# Altium PCB DAP-PCB-REV-4.PcbDoc (part 3 of 4)
Units mil, origin at the board's own origin, x right, y up, seen from the top; angles counter-clockwise.
Board outline 2559.06 x 2559.06 mil, 6 copper layers (L1 (SIG/PWR), L2 (GND), L3 (SIG), L4 (PWR), L5 (GND), L6 (SIG/PWR)), stack 64.976 mil thick; 309 components, 179 nets, 965 pads, 300 vias.
Unrouted connection lines stored in the file: 157.
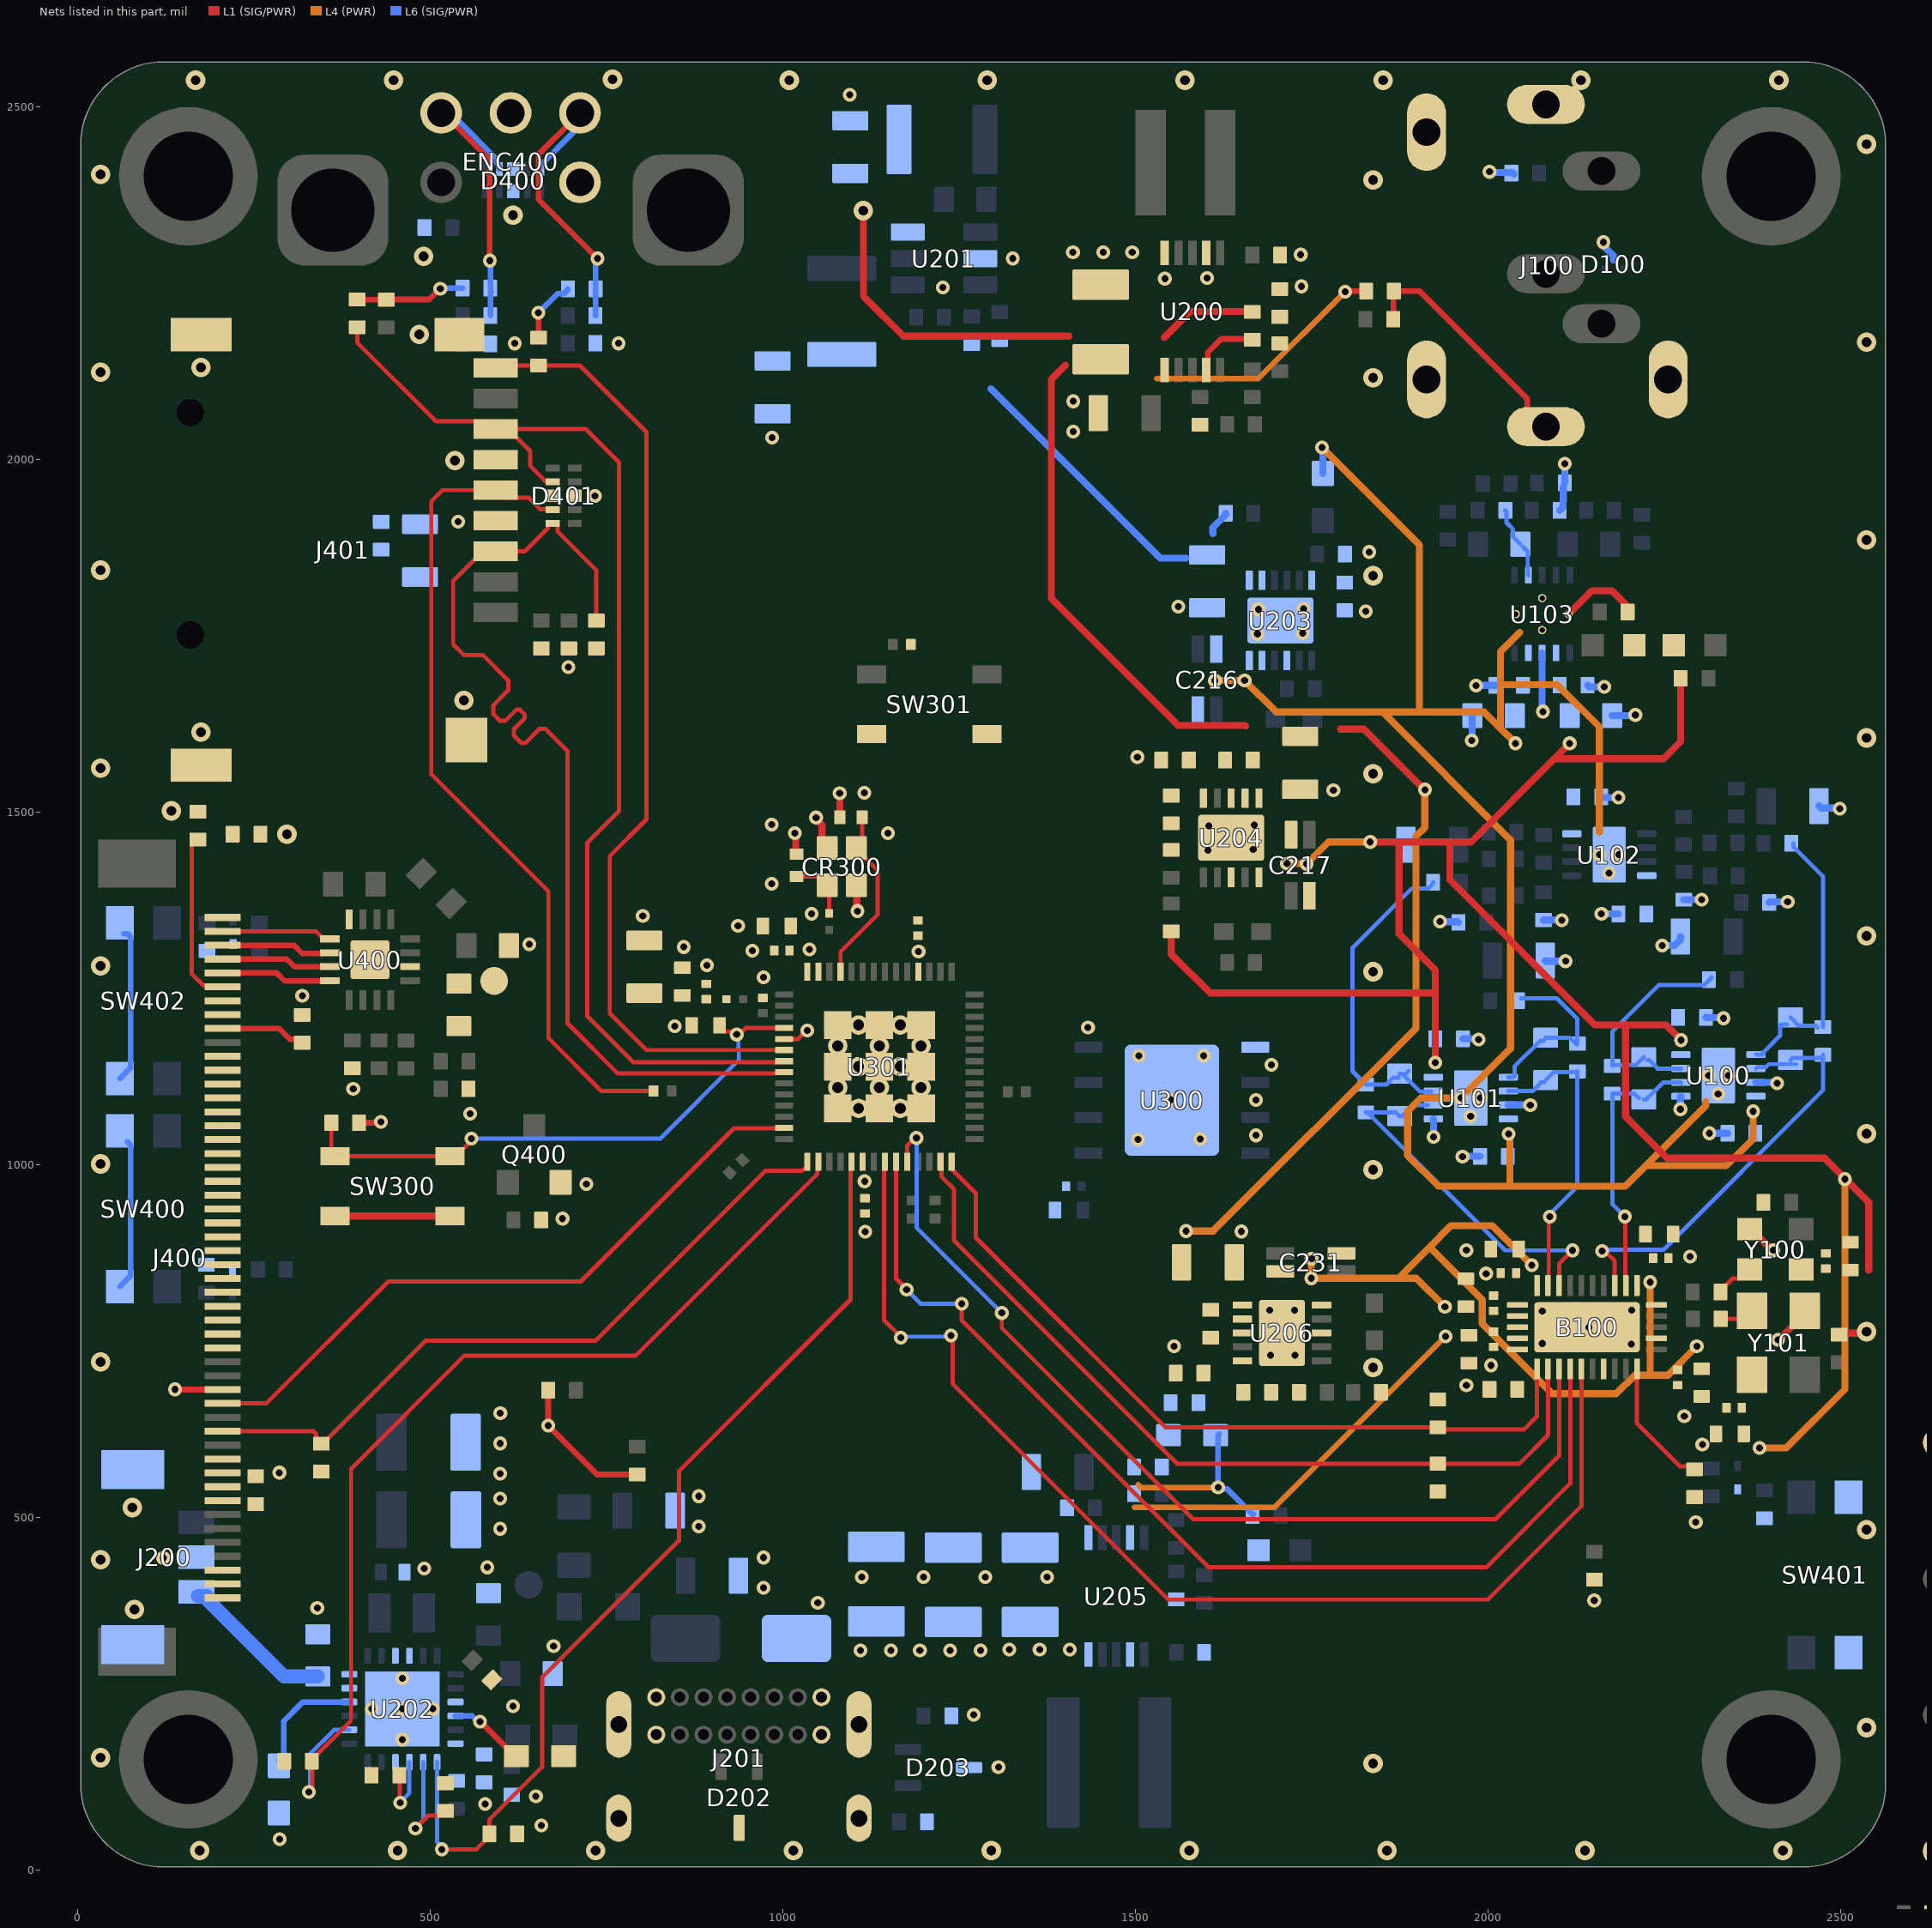
[diagram p5: the nets of this part, all layers, seen from the top]

## Via types
v1: diameter 19.68, hole 9.84, L1 (SIG/PWR) to L6 (SIG/PWR), tented both sides, 237 vias
v2: diameter 27.56, hole 13.78, L1 (SIG/PWR) to L6 (SIG/PWR), tented both sides, 56 vias
v3: diameter 49.21, hole 29.53, L1 (SIG/PWR) to L6 (SIG/PWR), 6 vias
v4: diameter 19.68, hole 9.84, L1 (SIG/PWR) to L6 (SIG/PWR), 1 vias

## Nets (pads, with @x,y where several pads share a name; then routed paths per layer and width w, separated by ;. In a path a pad name is that pad's centre, name@x,y a point inside that pad or via, vN(x,y) a via of type N, cw(c..) or ccw(c..) an arc to the next point about the centre after c; other vN are vias at no path point) (continued)
+3V3_DIG: B100.13 C122.2 C139.2 C225.2 C227.2 C228.2 C229.2 C300.2 C301.2 C303.2 C304.2 C305.2 C306.2 C307.2 C407.2 C408.2 C409.2 ENC400.4 J400.7 J400.8 J400.35 J400.40 J400.41 J400.42 J401.4 L300.2 R118.2 R208.2 R209.2 R210.2 R211.2 R223.2 R236.2 R241.2 R242.2 R253.2 R300.2 R301.2 R405.2 R407.2 R414.2 R415.2 R416.2 R417.2 R418.2 R419.2 SW400.2 SW400.4 SW401.2 SW401.4 SW402.2 SW402.4 TP203.1 U205.6 U301.20 U301.46 U301.55 U301.56 | length 2126.9
  L1 (SIG/PWR) w8: v1@139,681 139.71,681.71 J400.35@206,681.71 ; R415.2@396,2230.32 R415.2@399.32,2227 ; R300.2@399.69,1060 v1@429,1060 ; R415.2@402.32,2226.69 R418.2@438,2226.69 ; R418.2@438,2227 499,2227 514.08,2242.08 v1(514.82,2242.08) ; R419.2@654,2172.69 653.94,2172.74 653.94,2206.94 v1@654,2207 ; R211.2@669,681 667.7,679.7 667.7,630.55 v1(667.76,630.49) 736.93,561.32 794.69,561.32 R208.2@797,559 ; v1@1801,2239 R118.2@1827.32,2239
  L4 (PWR) w8: 1499,515 1697.66,515 1936.66,754 v1@1941,754 ; 1504,547 1508.05,542.95 v1(1617.43,542.95) ; 1530.28,2115 1674.55,2115 v1(1797.61,2238.07)
  L6 (SIG/PWR) w8: SW400.4@60.54,827.76 75.47,842.7 75.47,1028.61 71.09,1033 SW400.2@71,1033 ; SW402.4@60.54,1122.76 75.47,1137.7 75.47,1323.61 71.09,1328 SW402.2@66,1328 ; v1@516,2242 517,2243 R407.2@546.32,2243 ; v1(653.89,2208.14) 680.72,2234.97 689.79,2234.97 695.63,2240.82 R405.2@695.63,2242 ; R236.2@1619,619 1617.43,617.43 v1(1617.43,542.95) 1619.67,540.71 1630.57,540.71 1666.28,505 R253.2@1668,505
  other v1: 1112.45,416 1199.97,416 1287.48,416 1375,416 286.64,563.97 138.64,681.97 1939.86,757.2 1116.3,977 430.6,1061 1192.77,1302.77 1037.9,1305.75 696.2,1705.79 539.84,1912.16
+3V9: C204.2 C211.2 C220.2 C232.2 L201.1 R200.2 R225.2 R244.2 R250.2 TP209.1 U200.6 U201.6 U204.1 U204.2 U206.1 U206.2 | length 2213.5
  L1 (SIG/PWR) w10: v2(1114.55,2352.88) 1114.55,2231.45 1171,2175 1406,2175 ; 1401.04,2134.04 1381,2114 1381,1803 1561,1623 1656,1623 1656.56,1622.44 ; 1541,2173 1578,2210 R200.2@1670,2210 ; 1791,1618 1824,1618 1910,1532 v1@1911,1532
  L4 (PWR) w10: v1(1572.06,906.44) 1610.56,906.44 1898,1193.88 1898,1466 1910.58,1478.58 1910.58,1530.42 v1@1910,1531
  other v1: 1910.58,1532.11
+LED: C400.2 C413.2 J400.1 TP406.1 U400.6
-3V3: C108.2 C110.2 C125.2 C134.2 C135.2 C216.3 R220.2 R252.2 TP207.1 U100.4 U100.9 U101.4 U101.9 U102.4 U102.9 U103.4 U103.11 U203.11 U203.12 | length 3068.3
  L1 (SIG/PWR) w10: U103.11@2114.34,1781 2147.53,1814.19 2175.81,1814.19 R252.2@2197,1793
  L4 (PWR) w10: v1(1612.96,1686.62) 1613.16,1686.81 1655.81,1686.81 v1@1656,1687 ; v1(1655,1687) 1699.61,1642.39 1850.61,1642.39 ; v1(1764.88,2016.99) 1903,1878.88 1903,1642.39 ; U101.9@1961,1095 1905,1095 1886,1076 1886,1014 1930,970 2031,970 ; U101.9@1962,1095 2032,1165 2032,1461 1850.61,1642.39 ; v1@2030,1044 2031,1043 2031,970 ; v1@2040,1601 2039.94,1600.94 2035.78,1600.94 2017.74,1618.98 ; 2045,1755 2017.74,1727.74 2017.74,1681 ; 2158,1472 2158,1621 2098,1681 2017.74,1681 ; 2309,1090 2309,1084.28 2223.72,999 ; v1@2377,1076 2375.92,1074.92 2375.92,1036.92 2338,999 2223.72,999 ; 1850.61,1642.39 1903,1642.39 ; 1903,1642.39 1994.33,1642.39 2017.74,1618.98 ; 2017.74,1618.98 2017.74,1681 ; 2031,970 2194.72,970 2223.72,999
  L6 (SIG/PWR) w10: R220.2@1766,1980.46 v1@1766,2014
  other v1: 2029.19,1044 2375.92,1076.09 2038.94,1597.77
-3V9: C205.2 C206.2 C218.2 L202.2 R201.2 R219.2 R249.2 TP208.1 U203.1 U203.2 | length 412.6
  L6 (SIG/PWR) w10: 1295.44,2100.56 1535.65,1860.35 1572,1860.35 ; 1610,1895 1610,1903.72 1628.32,1922.03 R219.2@1628.32,1924
  other v1: 1411.96,2039.66
ADDR_DAC: B100.25 R135.1 | length 187.8
  L1 (SIG/PWR) w6: B100.25@2211.24,711 2211.24,633.76 2272.19,572.81 2291.19,572.81 R135.1@2295,569
BAT+: C215.2 J200.1 TP210.1 U202.11 U202.12 | length 220
  L6 (SIG/PWR) w20: J200.1@171,389 184,389 184.5,388.5 184.5,383.74 293.28,274.96 C215.2@341,274.96
BOOT0: R301.1 R302.1 TP300.1 U301.5 | length 33.8
  L1 (SIG/PWR) w6: U301.5@1002.41,1178.77 1021.77,1178.77 v1@1032,1189
  other v1: 1034.95,1190.89
BOOT_BQ: C207.2 U202.21
  other v1: 618,233
CD_SD: J401.CD R419.1 U301.6 | length 1368.8
  L1 (SIG/PWR) w6: J401.CD@593.12,2129.87 596.56,2133.32 R419.1@654,2133.32 712.69,2133.32 807,2039 807,1490 755,1438 755,1215 806.98,1163.02 U301.6@1002.41,1163.02
CE_BQ: R221.2 U202.1 U301.19 | length 1360.9
  L1 (SIG/PWR) w6: v1(517,30) 566,30 577.47,41.47 577.47,43.19 580.28,46 R221.2@582,46 ; R221.2@584.32,52 584.32,72.03 659,146.71 659,273.71 853,467.71 853,566 1096.46,809.46 1096.46,987.73 1096.55,987.82 1096.55,999.55 U301.19@1098,1001
  L6 (SIG/PWR) w6: U202.1@510.21,153.7 510.21,40.49 517,33.7 v1(517,30)
CHIP_PU: C309.2 R300.1 SW300.3 SW300.4 TP301.1 U301.4 | length 809.5
  L1 (SIG/PWR) w6: R300.1@360,1057 360.32,1056.69 360.32,1017.31 SW300.4@365.31,1012.32 SW300.3@528.69,1012.32 536.57,1012.32 v1@561,1036.76 ; C309.2@914,1193.54 914,1191.73 916.54,1189.19 927.11,1189.19 931.3,1185 938.7,1185 948.22,1194.52 U301.4@999.48,1194.52
  L6 (SIG/PWR) w6: v1(558.78,1037.39) 826.52,1037.39 938,1148.86 938,1162.58 937.42,1163.16 937.42,1182.58 v1(935,1185)
CLK_SD: D401.4 J401.5 R307.2 | length 1199.5
  L1 (SIG/PWR) w6: J401.5@593.12,1956.65 603.9,1945.87 640.13,1945.87 656,1930 ; J401.5@593.09,1956.68 517.68,1956.68 502,1941 502,1554 668,1388 668,1180 743,1105 815,1105 R307.2@817,1103 ; 656,1929.83 672.17,1929.83 D401.4@673,1929
CMD_SD: D401.5 J401.3 R414.1 U301.8 | length 1502.3
  L1 (SIG/PWR) w6: J401.3@593.12,1870.03 634.72,1870.03 667.16,1902.47 667.16,1907.39 669.08,1909.31 D401.5@674,1909.31 ; J401.3@593.42,1870.34 582.34,1859.25 564.25,1859.25 533,1828 533,1738 548,1723 575,1723 611,1687 611,1673 590,1652 590,1639 599,1630 607,1630 622.51,1645.51 627.49,1645.51 634.51,1638.49 634.51,1633.51 619,1618 619,1609 630.01,1597.99 634.99,1597.99 655,1618 664,1618 695,1587 695,1201 765.89,1130.11 989.1,1130.11 989.18,1130.19 1001.07,1130.19 U301.8@1002.41,1131.52 ; D401.5@678.92,1909.31 680.84,1907.39 680.84,1898.16 736,1843 R414.1@736,1773
CS_LCD: J400.38 R413.2 U301.15 | length 1002.6
  L1 (SIG/PWR) w6: J400.38@206,622.65 334.93,622.65 338.45,619.14 338.45,611.84 343.29,607 R413.2@344,607 ; R413.2@346,605 347.97,605 493.97,751 735,751 976,992 1028,992 1030.76,994.76 1033.56,994.76 1035,996.2 U301.15@1035,999
D/CX_LCD: J400.36 TP404.1 U301.13 | length 953.1
  L1 (SIG/PWR) w6: J400.36@206,662.02 268.02,662.02 441,835 714,835 931,1052 U301.13@997.6,1052
DACL: B100.8 C107.2 R103.1 U101.6 | length 528.7
  L1 (SIG/PWR) w6: B100.8@2101.01,829.11 2101.01,860.01 v1(2120,879)
  L6 (SIG/PWR) w5.98: C107.2@1874.76,1069.24 1869.31,1074.69 R103.1@1826.87,1074.69 1828.84,1074.69 2024.53,879 v1(2120,879) ; C107.2@1874.87,1069.34 1878.31,1069.34 1893.97,1085 U101.6@1915,1085
DACLB: B100.9 C101.2 R101.1 U101.2 | length 421.9
  L1 (SIG/PWR) w6: B100.9@2085.26,829.11 2086.2,830.05 2086.2,923.2 v1@2087,924
  L6 (SIG/PWR) w5.98: U101.2@2028.93,1104.84 2063.64,1104.84 2067.14,1108.35 2067.14,1109.06 2075.08,1117 C101.2@2079,1117 ; C101.2@2081.87,1120.34 2093.15,1131.62 2125.79,1131.62 R101.1@2126.87,1132.69 2126.87,969.87 v1@2086,929
  other v1: 2087.54,926.67
DACR: B100.3 C100.2 R100.1 U100.2 | length 623.2
  L1 (SIG/PWR) w6: v1(2162,878) 2165.7,878 2175.21,868.49 2175.51,868.49 2179.75,864.25 B100.3@2179.75,829.11
  L6 (SIG/PWR) w5.98: v1(2162,878) 2164,880 2249.02,880 2475,1105.98 R100.1@2475,1152 ; U100.2@2379.93,1136.84 2381.86,1138.77 2393.85,1138.77 2398.08,1143 C100.2@2437,1143 ; C100.2@2429,1149 2432,1152 R100.1@2475,1152 ; R100.1@2475,1156.32 R100.1@2475,1152
DACRB: B100.2 C106.2 R102.1 U100.6 | length 379.6
  L1 (SIG/PWR) w6: v1@2194,923 2194.75,922.25 2194.75,829.86 B100.2@2195.5,829.11
  L6 (SIG/PWR) w5.98: v1(2194,927) 2176.38,944.62 R102.1@2176.38,1101.13 2207.87,1101.13 C106.2@2214,1095 ; C106.2@2221,1092.96 2224.44,1092.96 2248.64,1117.16 2272.84,1117.16 U100.6@2274,1116
DAT0_SD: D401.2 J401.7 R415.1 U301.7 | length 1632.7
  L1 (SIG/PWR) w6: R415.1@397,2187.63 397,2166 508.96,2054.04 569.96,2054.04 J401.7@571,2053 ; 662.86,1970.29 667.71,1970.29 D401.2@670,1968 ; 663,1970 642.31,1990.69 642.31,2011.79 610.83,2043.26 720.74,2043.26 768,1996 768,1502 723,1457 723,1211 788.06,1145.94 1001.07,1145.94 U301.7@1002.41,1147.27
DATA1_DAC: B100.19 TP100.1 U301.23 | length 1517.9
  L1 (SIG/PWR) w6: U301.23@1160.87,1004.56 1160.87,839.13 v1@1177,823 ; v1(1253.85,803.35) 1253.85,780.15 1604,430 1998,430 2116.76,548.76 B100.19@2116.76,711
  L6 (SIG/PWR) w6: v1(1175.85,823.35) 1195.85,803.35 1252.35,803.35 v1@1254,805
DATA2_DAC: B100.18 TP101.1 U301.24 | length 1420.3
  L1 (SIG/PWR) w6: U301.24@1176.62,1004.56 1176.62,1027.62 v1@1188,1039 ; v1(1310.85,790.35) 1310.85,769.15 1582,498 2011,498 2101.01,588.01 B100.18@2101.01,711
  L6 (SIG/PWR) w6: v1@1191,1037 1189.85,1035.85 1189.85,911.35 v1(1310.85,790.35)
  other v1: 1189.85,1038.35
DATA_CLK_DAC: B100.20 TP102.1 U301.22 | length 1667.8
  L1 (SIG/PWR) w6: U301.22@1145.12,1004.56 1143.79,1003.22 1143.79,991.33 1143.7,991.25 1143.7,780.3 v1@1168,756 ; v1@1241,757.48 1241,690 1547,384 2000,384 2132.5,516.5 B100.20@2132.5,711
  L6 (SIG/PWR) w6: v1(1167.61,755.27) 1169.11,756.77 1238.77,756.77 v1@1240,758
  other v1: 1238.61,758.27
DVDD: B100.15 C117.2
EN1_BQ: R209.1 U202.2 | length 147.7
  L1 (SIG/PWR) w6: v1(479.44,59.56) 497.49,77.6 518.6,77.6 R209.1@523,82
  L6 (SIG/PWR) w5.98: v1@481.58,62.58 490.53,71.53 U202.2@490.53,153.7
EN2_BQ: R216.2 U202.3 | length 100.4
  L1 (SIG/PWR) w6: R216.2@457,133 457.34,132.66 457.34,96.66 v1(458,96)
  L6 (SIG/PWR) w6: v1(458,96) 458,96.96 470.84,109.8 U202.3@470.84,153.7
EN_DAC_LDO+: R244.1 R247.2 U206.3
EN_LDO+: R225.1 R231.2 U204.3
ENC_A_1: D400.5 ENC400.1 R400.1 R405.1 | length 427.9
  L1 (SIG/PWR) w7.99: ENC400.1@711,2484 705.43,2484 653.89,2432.47 653.89,2369 v1(737.82,2285.08)
  L6 (SIG/PWR) w7.99: D400.5@656.06,2411.5 656.06,2416.42 703.08,2463.44 703.08,2473.08 ENC400.1@708,2478 ; R400.1@734.69,2204 734.84,2204.16 R405.1@734.84,2239.84 ; R405.1@735,2242 735,2284 v1@736,2285
ENC_B_1: D400.2 ENC400.3 R407.1 R408.2 | length 422.7
  L1 (SIG/PWR) w7.99: ENC400.3@514,2486 524,2486 584.82,2425.18 v1(584.82,2282.08)
  L6 (SIG/PWR) w7.99: ENC400.3@523.65,2481.65 539.04,2481.65 594.55,2426.15 594.55,2420.44 597.39,2417.59 D400.2@597.39,2411.5 ; R408.2@585.69,2204 585.69,2236.69 R407.1@587,2238 ; R407.1@585.69,2243 v1@585.69,2282.32
FB_BB_3.3: C225.1 C226.1 R236.1 R240.2 U205.9
FB_BB_3.9: R200.1 R212.2 R213.2 U200.9 | length 91.8
  L1 (SIG/PWR) w7.99: U200.9@1600.68,2127.05 1602.69,2129.06 1602.69,2151.69 1622,2171 R200.1@1661,2171
GND: B100.11 B100.14 B100.22 B100.30 B100.31 C102.1 C103.1 C104.1 C105.1 C108.1 C109.1 C110.1 C111.1 C112.1 C113.1 C114.1 C115.1 C116.1 C117.1 C119.1 C120.1 C121.1 C122.1 C125.1 C126.1 C127.1 C128.1 C129.1 C130.1 C131.1 C132.2 C133.1 C134.1 C135.1 C136.1 C137.2 C139.1 C200.1 C202.1 C203.1 C204.1 C206.1 C208.1 C209.1 C210.1 C211.1 C213.1 C214.1 C215.1 C216.2 C217.2 C218.1 C219.1 C220.1 C221.1 C224.1 C227.1 C228.1 C229.1 C230.1 C231.2 C232.1 C234.1 C300.1 C301.1 C302.1 C303.1 C304.1 C305.1 C306.1 C307.1 C308.2 C309.1 C310.2 C311.1 C312.1 C400.1 C404.1 C405.1 C407.1 C408.1 C409.1 C412.1 C413.1 CR300.2 CR300.4 D100.1 D201.A D202.3 D203.3 D205.A D206.C D207.C D208.A D209.C D400.3 D400.8 D401.3 D401.8 D402.A D403.A D404.A ENC400.2 J100.1 J100.SH1 J100.SH2 J100.SH3 J200.2 J200.4 J200.5 J201.A1 J201.A12 J201.B1 J201.B12 J201.S1 J201.S2 J201.S3 J201.S4 J400.11 J400.12 J400.13 J400.14 J400.15 J400.16 J400.17 J400.18 J400.19 J400.20 J400.21 J400.22 J400.23 J400.24 J400.25 J400.26 J400.27 J400.28 J400.29 J400.30 J400.31 J400.32 J400.43 J400.48 J400.49 J400.50 J401.6 J401.G1 J401.G2 J401.G3 J401.G4 Q400.2 R106.1 R107.1 R108.1 R111.1 R112.1 R113.1 R126.1 R129.1 R133.1 R135.2 R205.1 R207.1 R212.1 R215.1 R216.1 R217.1 R218.1 R221.1 R224.1 R226.1 R228.1 R229.1 R230.1 R231.1 R234.1 R235.1 R239.1 R240.1 R245.1 R246.1 R247.1 R303.1 R401.1 R402.1 R403.1 R404.1 R406.1 R412.1 R413.1 R422.1 R424.1 R425.1 SW300.1 SW300.2 SW301.3 SW301.4 TP211.1 TP212.1 TP213.1 TP214.1 TP215.1 TP216.1 TP217.1 TP218.1 TP219.1 TP220.1 TP221.1 TP222.1 U100.3 U100.5 U101.3 U101.5 U103.3 U200.2 U200.5 U201.2 U202.4 U202.15 U202.16 U202.25 U203.9 U203.13 U204.8 U204.11 U205.2 U205.5 U206.8 U206.11 U300.4 U300.9 U301.57 U400.12 U400.17 Y100.2 Y101.2 | length 1195.4
  L1 (SIG/PWR) w10: SW300.2@365.31,927.68 519.32,927.68 SW300.1@522,925 ; v1@1018,1470 1018.73,1469.27 1018.73,1442.02 C308.2@1020,1440.75 ; v1@1047,1492 1047,1490.39 1056.08,1481.31 1056.08,1456.82 CR300.2@1063.33,1449.57 ; C310.2@1081.25,1493 1081.13,1493.13 1081.13,1526.13 v1@1083,1528 ; CR300.4@1103,1395 1105.38,1392.62 1105.38,1360.73 v1(1106.08,1360.02) ; Y100.2@2371.17,909.09 2373.13,909.09 v1@2402.22,880 ; v1@2412,751.94 2449.39,789.33 Y101.2@2449.39,793.27 ; R107.1@2498,759.68 2500.02,761.71 2529.71,761.71 v2@2534,766
  L6 (SIG/PWR) w10: U101.5@1922.63,1065.47 1922.74,1065.47 1922.81,1065.39 1922.81,1040.19 v1(1923,1040) ; v1@1933,1345 1957.32,1345 R126.1@1958.32,1344 ; C111.1@1964.68,1179 v1@1984,1179 ; v1@1965,1012 1965.38,1012.38 C110.1@1988.91,1012.38 ; v1(1977,1602) 1977.51,1602.51 1977.51,1636.49 C135.1@1978.01,1637 ; v1@1986,1680 C134.1@2010.32,1680 ; v1(2002.23,2408) 2003.23,2407 2035,2407 R129.1@2037,2405 ; U101.3@2028.93,1085.16 2029.01,1085.08 2059.92,1085.08 v1(2060,1085) ; U103.3@2076.94,1725.88 2076.94,1645.06 v1@2077,1645 ; C132.2@2078.95,1347.31 2104.69,1347.31 v1@2105,1347 ; C131.1@2081.4,1290 2082.4,1289 v1(2110,1289) ; R108.1@2101.68,1928 2106.53,1932.84 2106.53,1940.2 2107,1940.67 C133.1@2107,1961 ; C133.1@2109,1967 v1(2109,1994) ; C128.1@2141.22,1680.25 2143.47,1678 v1@2162,1678 ; C126.1@2160.68,1522 2161.68,1521 v1@2180,1521 ; v1@2162,1356 C125.1@2185.05,1356 ; v1@2163,2304 2165.27,2304 2165.58,2303.7 2165.58,2301.42 2178,2289 D100.1@2178,2282.91 ; C129.1@2176.05,1637.25 2209.25,1637.25 v1@2210,1638 ; v1(2247,1311) 2264.22,1311 2273,1319.78 C136.1@2273,1324 ; v1@2273,1082 2273,1097.39 2273.08,1097.47 U100.5@2273.63,1097.47 ; C137.2@2277.57,1376.31 2302.69,1376.31 v1@2303,1376 ; C109.1@2309.06,1209.13 2309.2,1209 v1@2334,1209 ; v1@2315,1045 2315.13,1045.13 C108.1@2339.69,1045.13 ; U100.3@2379.93,1117.16 2380.01,1117.08 2408.92,1117.08 v1(2410,1116) ; R133.1@2398.68,1372 2399.68,1373 v1@2418,1373 ; C130.1@2469.4,1509 2472.4,1506 v4@2493,1506
  other v1: 286.95,44.55 658,64 578.32,94.09 650.32,105.09 1306.03,146.65 461,185.69 1271.03,220.65 417.69,229 461,229 504.31,229 461,272.31 1110.62,311.96 1153.62,311.96 1194.62,311.96 1237.62,311.96 1280.62,311.96 1321.41,313.02 1364.41,313.02 1407.41,313.02 675.32,318.09 340.32,372.09 1049.95,379.55 2150.71,382.83 973.05,400.6 492,428 581.28,429.71 122,443 973.05,443.6 599.66,484.42 881.05,487.6 2294.71,493.83 599.66,527.42 881.05,530.6 599.66,562.42 2304,604 599.66,605.42 2278.43,644.11 599.84,648.42 1969.43,687.84 2004.43,716.11 1691.7,730.16 1726.7,730.16 1554.96,743.1 2203.08,746.07 2077.08,747.07 2411.43,752.11 2143.08,770.07 2077.08,793.07 1690.7,794.16 1725.7,794.16 2204.08,794.07 1997.43,846.11 2286.43,870.11 1969.43,879.11 2404.43,879.11 1116.96,905.65 1650.36,905.77 688,924 722,973 1963.92,1012.09 1504,1036 1592,1037 1671.1,1042.1 2313.92,1045.09 556.96,1072.77 2272.92,1079.09 1549.8,1092.52 1671.1,1092.1 391.32,1108.09 1693.1,1142.1 1505,1154.84 1597,1154.84 1986.92,1178.09 1433,1195 847.13,1196.86 2333.92,1208.09 319,1240 972.86,1266.09 892.86,1283.09 957,1304 859.86,1309.09 641,1313 936.86,1339.09 1931.92,1345.09 2104.92,1347.09 801.86,1353.09 1041.08,1356.02 2160.92,1356.09 2424.92,1373.09 2302.92,1376.09 984.36,1398.66 1603.16,1446.3 1667.16,1447.3 1017.46,1470.55 1149.25,1470.51 1604.48,1480.95 984.36,1482.66 1668.48,1481.95 1047.46,1492.55 2184.92,1521.09 1081,1527 1115.87,1527.52 1780.89,1531.31 1503.02,1578.32 2209,1638 2077.94,1642.77 2165,1678 1982.94,1679.77 1673.27,1752.99 1737.27,1753.99 1826.88,1784.99 1674.59,1787.64 1738.59,1788.64 1560.96,1791.62 1831.88,1868.99 734.18,1948.4 985,2031 1411.96,2082.66 620.36,2164.73 767.36,2164.73 1227.32,2244.09 1735.61,2245.59 1541.99,2256.45 1601.99,2257.45 1326.32,2285.09 1734.61,2290.59 1411.7,2293.77 1454.7,2293.77 1495.7,2293.77 2163.72,2308.17 1095.32,2517.09
  other v2: 173.58,28.18 454.15,28.18 734.73,28.18 1015.3,28.18 1295.87,28.18 1576.45,28.18 1857.02,28.18 2137.59,28.18 2418.17,28.18 1837.18,151.83 33.18,159.83 2536.82,202.58 81,370 33.18,440.41 2536.82,483.15 78.18,514.41 1837.18,712.98 33.18,720.98 2536.82,763.73 1837.18,993.55 33.18,1001.55 2536.82,1044.3 1837.18,1274.13 33.18,1282.13 2536.82,1324.87 297.42,1469.04 133.42,1502.04 1837.18,1554.7 33.18,1562.7 2536.82,1605.45 175.41,1613.61 548.41,1658.61 1837.18,1835.27 33.18,1843.27 2536.82,1886.02 535.41,1998.61 1837.18,2115.85 33.18,2123.85 175.41,2130.61 2536.82,2166.59 485.06,2177.26 491.21,2288.01 617.86,2346.6 1837.18,2396.42 33.18,2404.42 2536.82,2447.17 167.83,2537.82 448.41,2537.82 1009.55,2537.82 1290.13,2537.82 1570.7,2537.82 1851.27,2537.82 2131.85,2537.82 2412.42,2537.82 759,2539
  other v4: 2498.92,1505.09
GPIO1_DAC: B100.17 R112.2 U301.27 | length 1185.5
  L1 (SIG/PWR) w6: U301.27@1223,999 1225.19,996.81 1225.19,983.81 1243,966 1243,893 1559.32,576.68 R112.2@1929,576.68 ; R112.2@1931,577 1931.32,576.68 2044.68,576.68 2085.26,617.26 B100.17@2085.26,700.26
GPIO2_DAC: B100.16 R113.2 U301.28 | length 1089.1
  L1 (SIG/PWR) w6: U301.28@1239.24,994.76 1240.94,994.76 1240.94,993.06 1274,960 1274,897 1542.68,628.32 R113.2@1929,628.32 ; R113.2@1936,627 1936,626.81 1937.81,625 2051,625 2069.51,643.51 B100.16@2069.51,711
ILIM_BQ: R217.2 U202.22 | length 105.7
  L1 (SIG/PWR) w7.99: v1(571,211) 571.57,211 616.57,166 R217.2@620,166
  L6 (SIG/PWR) w7.99: U202.22@536.32,219.14 559.7,219.14 567.84,211 v1(571,211)
ILIM_DAC_LDO+: R246.2 U206.5
ILIM_LDO+: R229.2 U204.5
ILIM_LDO-: R230.2 U203.6
IM0: J400.6 R402.2 | length 246.8
  L1 (SIG/PWR) w6: R402.2@172,1460 167.72,1460 162.19,1454.47 162.19,1271.42 179.11,1254.5 204.08,1254.5 J400.6@206,1252.57
IM3: J400.9 R403.2 | length 121.4
  L1 (SIG/PWR) w7.99: J400.9@206,1193.52 286.48,1193.52 301.88,1178.12 314.19,1178.12 R403.2@319,1173.32
INT_BQ: R210.1 U202.8 U301.16 | length 1457.9
  L1 (SIG/PWR) w6: v1(328.37,111.33) 328.37,115.03 333,119.66 R210.1@333,155 ; R210.1@332.69,155 332.69,156.97 388.26,212.55 388.26,569.26 549,730 792,730 1049.3,987.3 1049.3,1003.22 U301.16@1050.63,1004.56
  L6 (SIG/PWR) w6: v1@330,112 330,165 364.47,199.47 U202.8@385.7,199.47
ISET_BQ: R218.2 U202.10 | length 163.2
  L6 (SIG/PWR) w7.99: R218.2@286,156 286.81,156 293,162.19 293,212 319.84,238.84 U202.10@385.7,238.84
IV_L: C107.1 R103.2 R116.1 U101.7 | length 472.4
  L6 (SIG/PWR) w5.98: C107.1@1874,1124 1866.02,1124 1856.09,1114.06 R103.2@1826.87,1114.06 1808,1132.93 1808,1308 1892.18,1392.18 1915.46,1392.18 1922.32,1399.03 R116.1@1922.32,1401 ; C107.1@1874.87,1129.4 1878.31,1129.4 1903.61,1104.1 1919.9,1104.1 U101.7@1920,1104 ; C107.1@1881,1127 C107.1@1887.88,1133.88
IV_LB: C101.1 R101.2 R123.1 U101.1 | length 255.4
  L6 (SIG/PWR) w5.98: U101.1@2028.93,1124.53 2035.82,1124.53 2037.75,1126.46 2037.75,1139.72 2074.02,1176 C101.1@2079,1176 ; R123.1@2047,1236 2047.52,1236.52 2097.48,1236.52 2126.87,1207.13 R101.2@2126.87,1172.06 ; C101.1@2081.87,1180.4 2116.56,1180.4 2125.96,1171 R101.2@2126.87,1171
IV_R: C100.1 R100.2 R121.1 U100.1 | length 392.4
  L6 (SIG/PWR) w5.98: U100.1@2379.93,1156.53 2388.79,1156.53 2390.72,1158.46 2390.72,1160.11 2414.28,1183.67 2414.28,1197.78 2415.5,1199 C100.1@2424,1199 ; C100.1@2429,1209.06 2440.28,1197.78 2446.68,1197.78 2447.23,1197.23 2464.77,1197.23 R100.2@2467,1195 ; R121.1@2433,1456 2433,1451.16 2475,1409.16 R100.2@2475,1195.69
IV_RB: C106.1 R102.2 R131.1 U100.7 | length 324
  L6 (SIG/PWR) w5.98: C106.1@2221,1153.02 2209.72,1141.74 2177.62,1141.74 R102.2@2176.38,1140.5 2176.38,1189.38 2242,1255 2306.46,1255 2317,1265.54 R131.1@2317,1266 ; C106.1@2226,1149 2228.46,1149 2240.62,1136.84 U100.7@2273.63,1136.84
JACK_DET: J100.4 R118.1 R119.2 | length 312.1
  L1 (SIG/PWR) w7.99: R119.2@1867,2201 1866.18,2201.82 1866.18,2238.5 R118.1@1866.68,2239 1903,2239 2055.66,2086.34 2055.66,2068.56 2056.22,2068 J100.4@2059,2068
LDO_BQ: C214.2 R214.2 U202.24
LED1: J400.2 U400.13 | length 148.3
  L1 (SIG/PWR) w6: J400.2@206,1331.31 338.61,1331.31 348.92,1321 U400.13@350,1321
LED2: J400.3 U400.14 | length 151.8
  L1 (SIG/PWR) w7.99: J400.3@206,1311.63 307.37,1311.63 319,1300 U400.14@353,1300
LED3: J400.4 U400.15 | length 149.5
  L1 (SIG/PWR) w7.99: J400.4@206,1291.94 297.06,1291.94 308,1281 U400.15@351,1281
LED4: J400.5 U400.16 | length 150.7
  L1 (SIG/PWR) w7.99: J400.5@206,1272.26 282.63,1272.26 293.89,1261 U400.16@352,1261
LEFT_EAR: C138.1 R127.1 U103.7 | length 99.7
  L6 (SIG/PWR) w5.98: R127.1@2024.68,1928 2026.28,1926.4 2026.28,1910.72 2035.64,1901.36 2035.64,1890.36 C138.1@2046,1880 ; C138.1@2050,1876 2056.41,1869.59 2056.41,1836.96 U103.7@2057.25,1836.12